# Altium PCB Tablet_Design.PcbDoc (part 3 of 6)
Units mil, origin at the board's own origin, x right, y up, seen from the top; angles counter-clockwise.
Board outline 3823 x 4035 mil, 2 copper layers (Top Layer, Bottom Layer), stack 57 mil thick; 254 components, 256 nets, 1099 pads, 445 vias.
Unrouted connection lines stored in the file: 188.
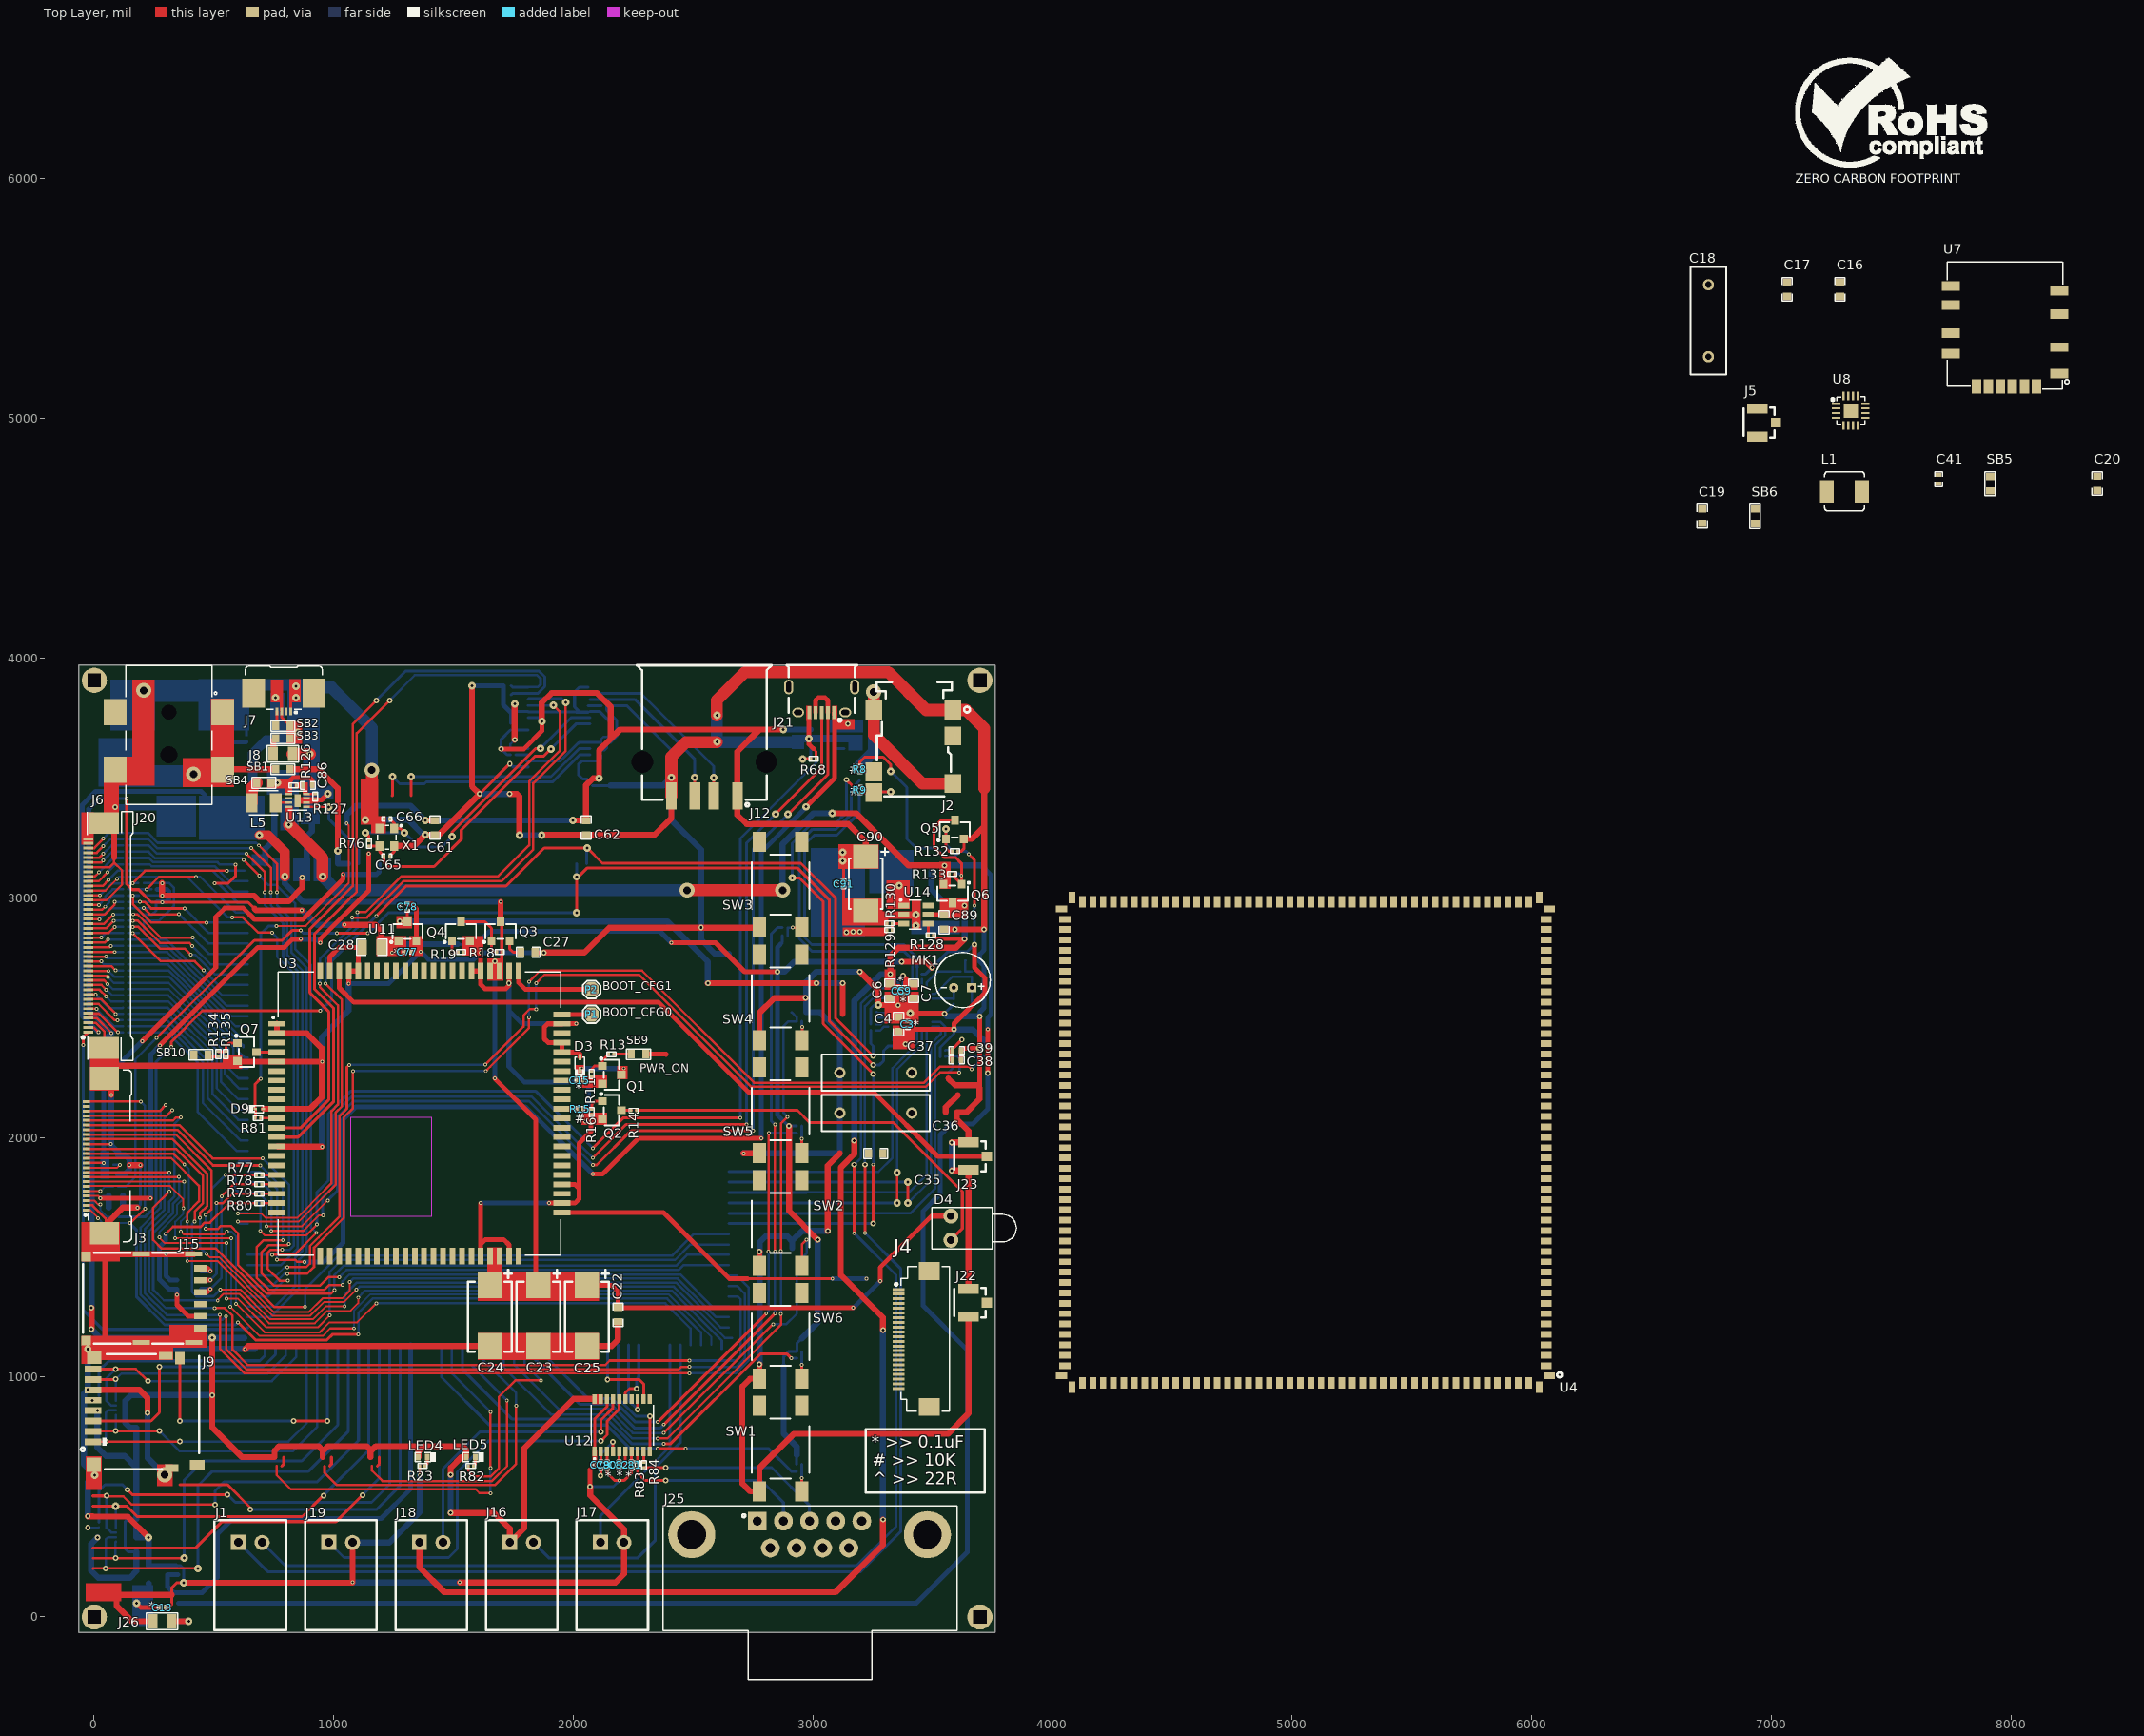
[diagram p0: Top Layer view]

## Part data (continued)
R4 R5 R25 R26 R29 R30 R32 R33 R35 R37 R60 R83 R84 R117 R119: library part AC0201FR-07100RL, "RES SMD 100 OHM 1% 1/20W 0201", Case/Package=0201, Case Code (Metric)=0603, Manufacturer=Yageo, Max Operating Temperature=155°C, Max Power Dissipation=50mW, Min Operating Temperature=-55°C, Resistor Type="Thick Film", Supplier Part Number 1=YAG3412CT-ND, Temperature Coefficient=200ppm/°C, Tolerance=1%, Case Code (Imperial)=0201, Category="Chip SMD Resistors", ComponentLink1Description=http://www.yageo.com/NewPortal/yageodocoutput?fileName=/pdf/R-Chip/PYu-AC_51_RoHS_L_6.pdf&src-supplier=Digi-Key, ComponentLink1URL=http://www.yageo.com/NewPortal/yageodocoutput?fileName=/pdf/R-Chip/PYu-AC_51_RoHS_L_6.pdf&src-supplier=Digi-Key, Features="Moisture Resistant,Automotive AEC-Q200", Height=0.01inch, Length=0.024inch, Manufacturer Part Number=AC0201FR-07100RL, Number of Terminations=2, Packaging="Tape and Reel", Pricing 1="1=0.10000, 10=0.06300, 100=0.02560, 1000=0.01149, 2500=0.00997, 5000=0.00823 (USD)", Resistance=100R, RoHS=Yes, RoHS Compliant=Yes, Stock 1=124190, Supplier 1=Digi-Key, Width=0.012inch
R6 R24 R81: library part RC0201JR-070RL, "RES SMD 0 OHM JUMPER 1/20W 0201"